# EAGLE board tht_led_pair (EAGLE 9.6.2)
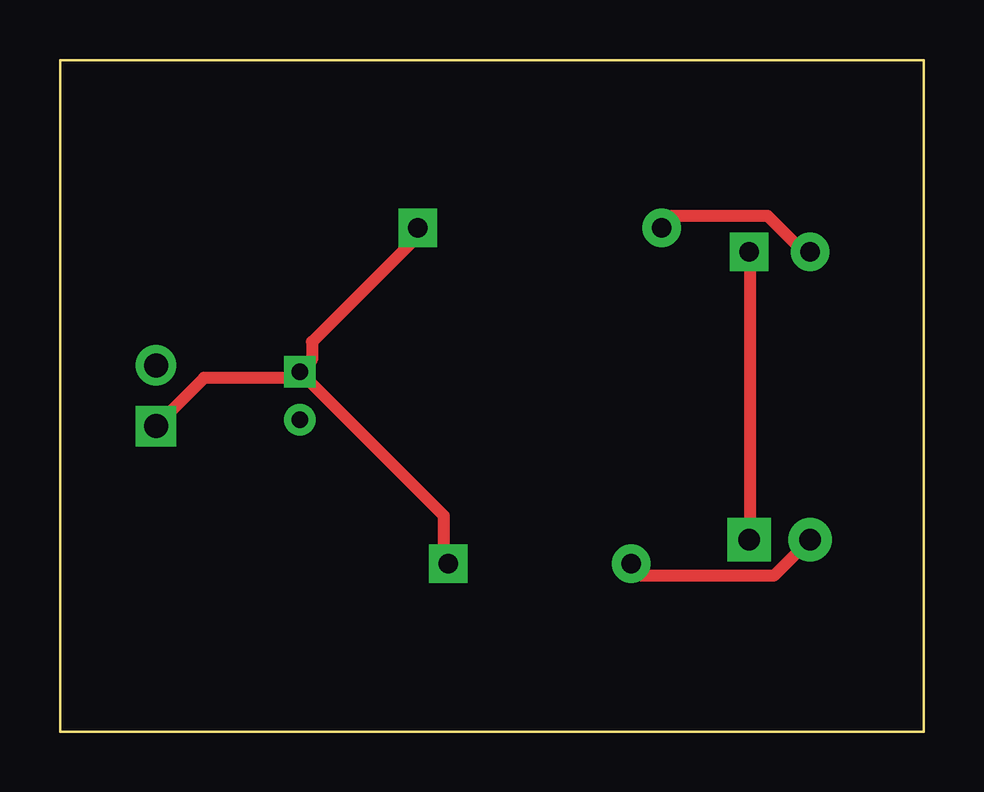
[diagram p0: board, top side]
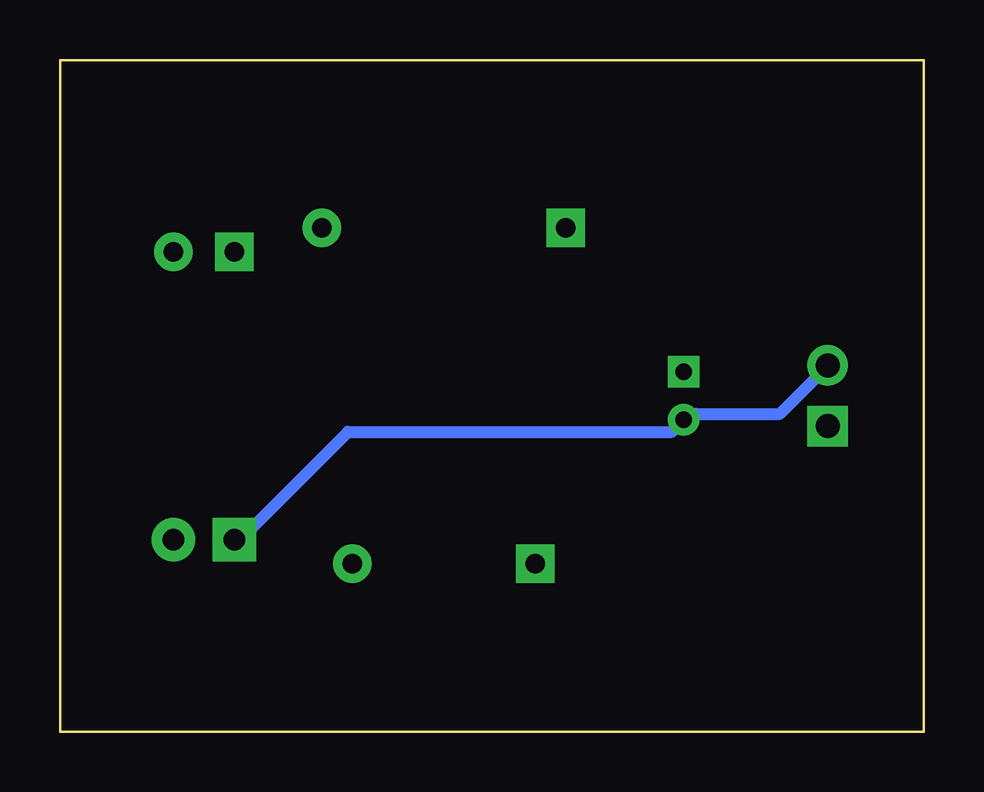
[diagram p1: board, bottom side, seen from below]

Size 36 x 28 mm. Coordinates in mm from the lower left corner, seen from the top.
Outline: 0,0 36,0 36,28 0,28 0,0
Copper layers used: Top, Bottom
Design rules "eh3d-kit": minimum track width 0.15mm, minimum drill 0.3mm, track to track 0.15mm, track to pad 0.15mm, pad to pad 0.15mm, via to via 0.15mm, smd to smd 0.15mm, copper to edge 0.3mm, drill to drill 0.25mm, minimum pad ring 0.15mm, minimum via ring 0.15mm

## Footprints (pad centres in the part's own frame; a part is rotated, then mirrored left to right if it is on the bottom)
C-ELEC-D5 = drill 0.7 pad 1.3 square: 1 -1,0 | drill 0.7 pad 1.3: 2 1,0
LED-THT-3MM = drill 0.8 pad 1.6 square: 1 -1.27,0 | drill 0.8 pad 1.6: 2 1.27,0
LED-THT-5MM = drill 0.9 pad 1.8 square: 1 -1.27,0 | drill 0.9 pad 1.8: 2 1.27,0
HDR-1X02 = drill 1 pad 1.7 square: 1 -1.27,0 | drill 1 pad 1.7: 2 1.27,0
R-AXIAL-10.16 = drill 0.8 pad 1.6 square: 1 -5.08,0 | drill 0.8 pad 1.6: 2 5.08,0
R-AXIAL-7.62 = drill 0.8 pad 1.6 square: 1 -3.81,0 | drill 0.8 pad 1.6: 2 3.81,0

## Placement (x,y rotation side)
C1  10u  [C-ELEC-D5]  10,14 270 top
D1  YELLOW  [LED-THT-3MM]  30,20 0 top
D2  BLUE  [LED-THT-5MM]  30,8 0 top
J1  PWR  [HDR-1X02]  4,14 90 top
R1  470  [R-AXIAL-10.16]  20,21 0 top
R2  470  [R-AXIAL-7.62]  20,7 0 top

## Library data of the parts
C1 D1 D2 J1 R1 R2 = eh3d-kit

## Nets
A1: D1.2 R1.2
A2: D2.2 R2.2
GND: C1.2 D1.1 D2.1 J1.2
VCC: C1.1 J1.1 R1.1 R2.1

## Tracks (layer width: path | path; a pad name or v marks a point on that pad's centre or on a via)
A1
  Top 0.5: D1.2 30.75,20.25 29.5,21.5 25.5,21.5 R1.2
A2
  Top 0.5: D2.2 30.75,7.5 29.75,6.5 24.25,6.5 R2.2
GND
  Top 0.5: D1.1 28.75,19.5 28.75,8.5 D2.1
  Bottom 0.5: J1.2 4.5,14.75 6,13.25 9.5,13.25 C1.2 10.5,12.5 24,12.5 28.25,8.25 D2.1
VCC
  Top 0.5: C1.1 9.5,14.75 6,14.75 4.5,13.25 J1.1 | R1.1 14.75,20.5 10.5,16.25 10.5,15.5 C1.1 | R2.1 16,7.5 16,9 C1.1